# Altium PCB Main.PcbDoc
Units mil, origin at the board's own origin, x right, y up, seen from the top; angles counter-clockwise.
Board outline 791.74 x 1774.06 mil, 2 copper layers (Top Layer, Bottom Layer), stack 64.8 mil thick; 28 components, 18 nets, 121 pads, 67 vias.
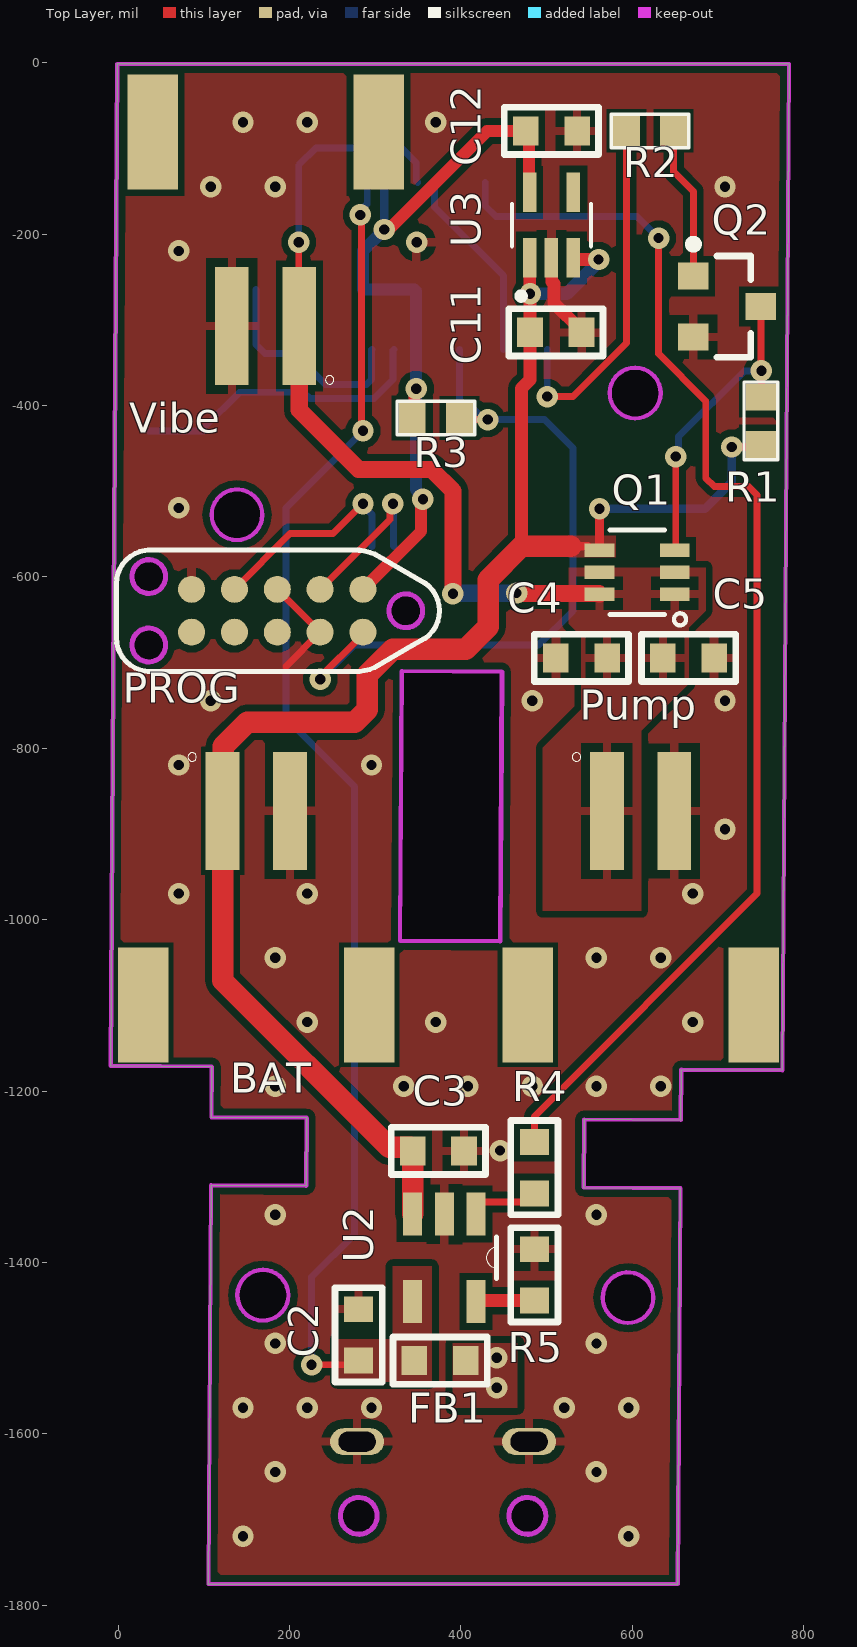
[diagram p0: Top Layer view]
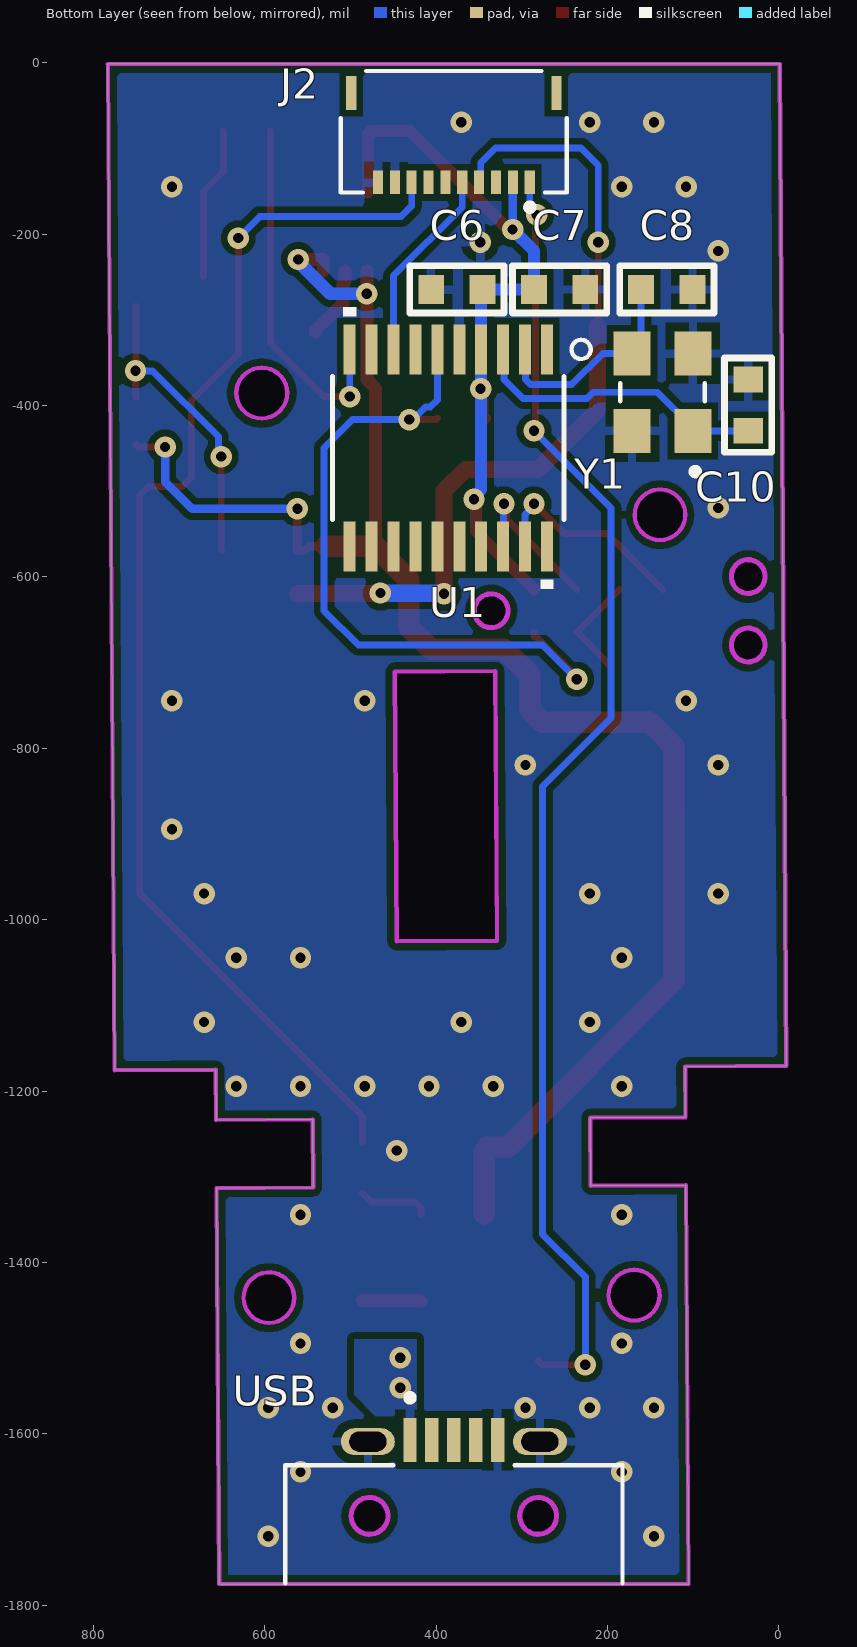
[diagram p1: Bottom Layer view, seen from below]
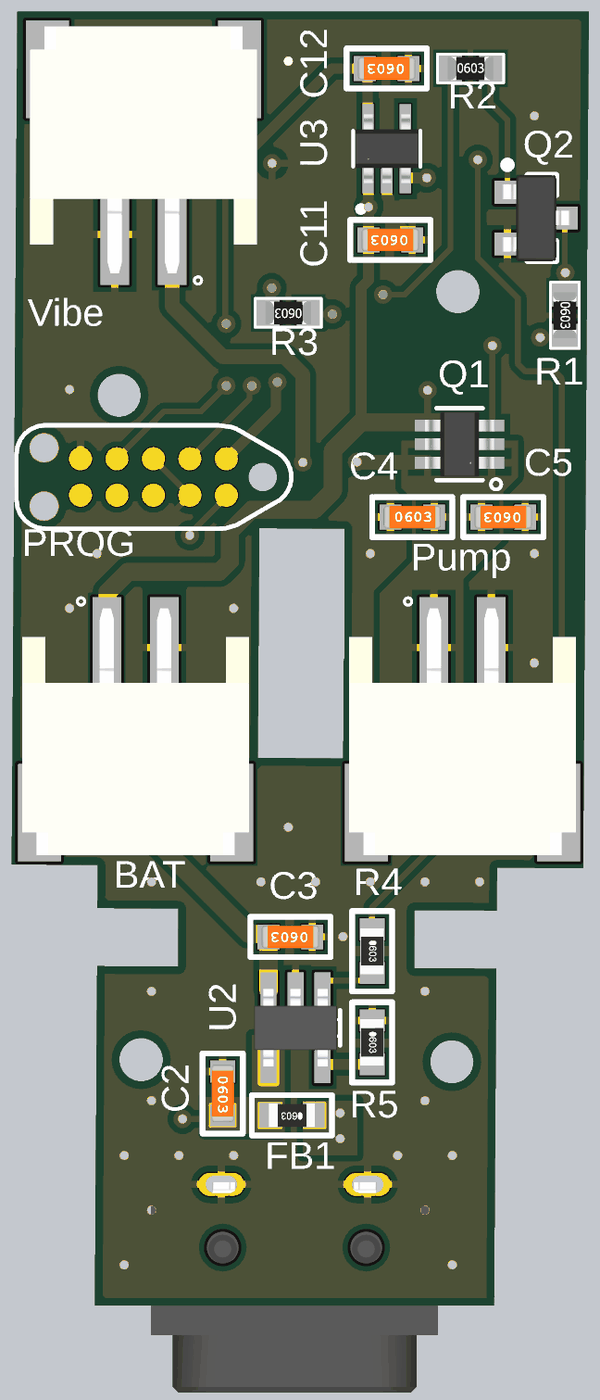
[diagram p2: 3D render of the assembled board from above, using the file's embedded part models]
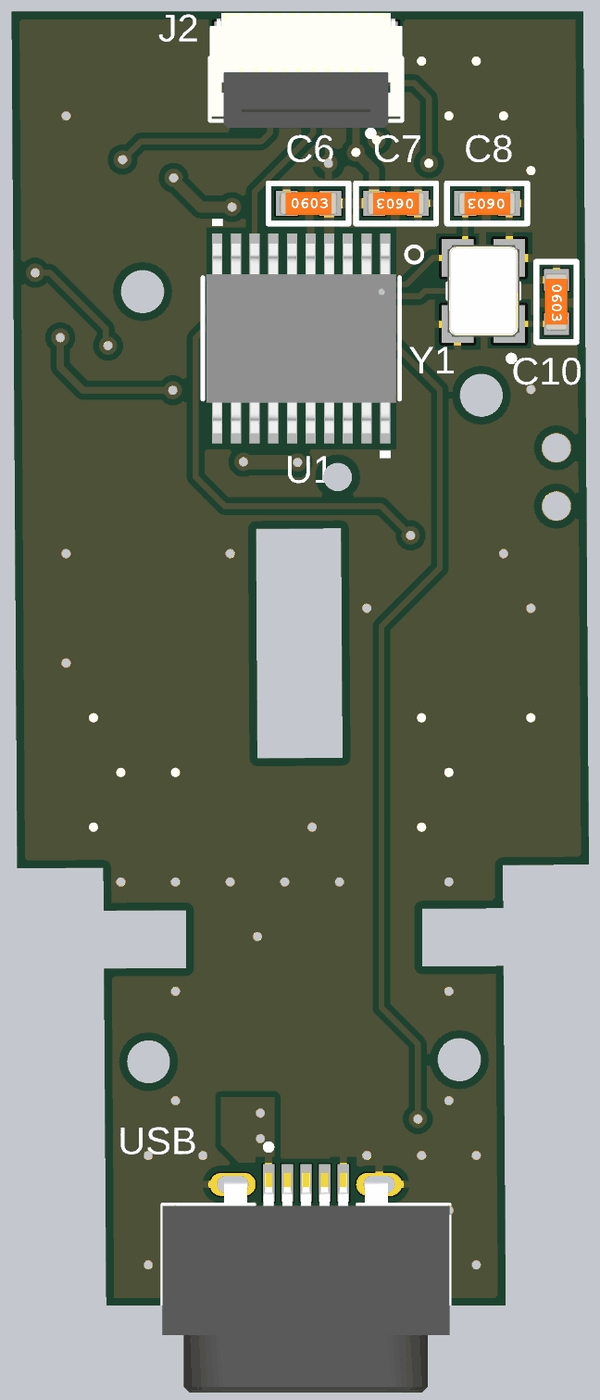
[diagram p3: 3D render of the assembled board from below, using the file's embedded part models]

## Layer stack, top to bottom
Top Solder: solder mask 0.4, Solder Resist, Dk 3.5
Top Layer: signal copper 1.4
Dielectric 1: dielectric 62, FR-4, Dk 4.8
Bottom Layer: signal copper 1.4
Bottom Solder: solder mask 0.4, Solder Resist, Dk 3.5

## Board outline
108.57,-1309.86 219.51,-1310.55 219.78,-1310.1 220.01,-1231.1 109.1,-1230.4 109.23,-1171.32 -8.61,-1170.54 -0.85,-1.26 783.13,-1.25 775.36,-1175.75 657.52,-1174.96 657.26,-1175.23 656.87,-1233.83 544.28,-1233.13 544.02,-1233.39 543.52,-1312.13 543.78,-1312.58 656.34,-1313.29 653.25,-1775.31 560.2,-1775.31 105.48,-1775.3
cut-out: 565.7,-1440.82 ccw(c595.24,-1441.02) 624.78,-1441.21 ccw(c595.24,-1441.02)
cut-out: 139.24,-1438.02 ccw(c169.04,-1437.97) 198.84,-1438.41 198.84,-1438.19 ccw(c169.04,-1438.37)
cut-out: 573.74,-385.16 ccw(c603.54,-385.12) 633.34,-385.55 633.34,-385.33 ccw(c603.53,-385.5)
cut-out: 109.3,-527.19 ccw(c138.82,-527.39) 168.35,-527.59 ccw(c138.82,-527.39)
cut-out: 329.36,-1024.46 445.91,-1025.23 446.18,-1024.97 448.26,-710.91 448.26,-710.93 446.18,-1024.78 448,-710.45 331.45,-709.68 331.18,-709.94 329.1,-1024 329.1,-1023.98

## Design rules (kind name [scope] priority, off if disabled: settings)
Clearance [All vs (InComponent('BAT') OR InComponent('Pump'))] p1: gap=6 ignorepadtopadclearanceinfootprint=TRUE except(1: Arc-SMDPad Track-SMDPad SMDPad-SMDPad)
Clearance Clearance_1 [All] p2: gap=8 ignorepadtopadclearanceinfootprint=TRUE except(0: Arc-Hole Track-Hole SMDPad-Hole THPad-Hole Via-Hole Fill-Hole Poly-Hole Region-Hole Text-Hole; 1: Arc-Text Track-Text SMDPad-Text THPad-Text Via-Text Fill-Text Poly-Text Region-Text Text-Text)
ComponentClearance [All] p1: gap=5 collisioncheckmode=3 verticalgap=5 showdistances=FALSE
MinimumSolderMaskSliver [All] p1: minsoldermaskwidth=5
PolygonConnect [All] p1: connectstyle=Relief reliefconductorwidth=10 reliefentries=4 polygonreliefangle="90 Angle" airgapwidth=10
RoutingVias [All] p1: holewidth=12 width=25 viastyle="Through Hole" minholewidth=12 minwidth=25 maxholewidth=28 maxwidth=50
SilkToSilkClearance [All] p1: silktosilkclearance=1
SilkToSolderMaskClearance [IsPad] p1: minsilkscreentomaskgap=0 clearancetoexposedcopper=TRUE
SolderMaskExpansion [All] p1: expansion=4 istentingtop=FALSE
SupplyNets "Schematic Supply Nets_5" [InNet('GND')] p1: voltage=0.000
SupplyNets "Schematic Supply Nets_4" [InNet('VCC')] p2: voltage=0.000
SupplyNets "Schematic Supply Nets_3" [InNet('VBUS')] p3: voltage=0.000
SupplyNets "Schematic Supply Nets_2" [InNet('VBAT')] p4: voltage=0.000
SupplyNets "Schematic Supply Nets_1" [InNet('Vmot')] p5: voltage=0.000
Width [All] p1: maxlimit=50 minlimit=8 preferedwidth=8 minimp=50.000000 maximp=50.000000 favimp=50.000000
26 further rules are at their usual default settings.

## Components (designator, comment, footprint, x,y, rotation, side; value= is the part's Value field where it differs from the comment)
BAT "S2B-PH-SM4-TB" JST_S2B-PH-SM4-TB 161.38,-873.06 r180 top
C2 "4.7 µF" CAP0603 280.87,-1484.44 r270 top
C3 "4.7 µF" CAP0603 373.81,-1269.87 r180 top
C4 "4.7 µF" CAP0603 540.87,-694.44 r0 top
C5 "4.7 µF" CAP0603 665.87,-694.44 r180 top
C6 "0.1 µF" CAP0603 375.87,-264.44 r180 bottom
C7 "4.7 µF" CAP0603 255.87,-264.44 r0 bottom
C8 "20pF" CAP0603 130.87,-264.44 r0 bottom
C10 "20pF" CAP0603 35.87,-399.44 r270 bottom
C11 "1 µF" CAP0603 510.87,-314.44 r180 top
C12 "1 µF" CAP0603 505.87,-79.44 r180 top
FB1 "220 Ohms" RES_0603 375.87,-1514.44 r180 top
J2 "5034801000" MOLEX_5034801000 379.37,-139.44 r0 bottom value=10
PROG "Programming Connector" TC2050 185.87,-639.44 r180 top value=TC2050-NL
Pump "S2B-PH-SM4-TB" JST_S2B-PH-SM4-TB 609.93,-873.06 r180 top
Q1 "MIC94052YC6-TR" SC70-6_MC_MCH 605.87,-594.44 r180 top value="MOSFET P-CH 6V 2A SC70-6"
Q2 "Transistor" SOT23 710.87,-284.44 r0 top value=MMBT2222LT1G
R1 "Resistor" "RES 0603" 750.24,-417.75 r270 top value=10K/1%
R2 "Resistor" "RES 0603" 620.87,-79.44 r0 top value=2.2K/1%
R3 "Resistor" "RES 0603" 370.87,-414.44 r180 top value=10K/1%
R4 "470 Ohms" RES_0603 485.87,-1289.44 r270 top
R5 "2K" RES_0603 485.87,-1414.44 r270 top
U1 "STM32G030F6P6" TSSOP20 385.87,-449.44 r270 bottom
U2 "MCP73831T-2ACI/OT" SOT95P280X145-5N 380.87,-1394.44 r270 top
U3 "MIC5365-3.3YC5-TR" SOT65P210X110-5N 505.87,-189.44 r90 top value="3V3 LDO"
USB "UJ2-MIBH-4-SMT-TR-67" CUI_UJ2-MIBH-4-SMT-TR-67 379.37,-1774.44 r90 bottom value="USB 2.0"
Vibe "S2B-PH-SM4-TB" JST_S2B-PH-SM4-TB 172.2,-306.98 r0 top
Y1 "ECS-80-12-33-JGN-TR" XTAL_ECS-240-8-33-AGN-TR 135.87,-384.44 r90 bottom value="8 MHz"

## Footprints (in the part's own frame and the unit in brackets; to place one, negate y for a bottom-side part, rotate by r counter-clockwise, add the part's x,y. Pads: shape width x height; smd on the part's side, far side on the other; paste and mask are expansions set on the pad)
CAP0603 [mil]
  rect 30x34 smd mask+2: 1(-30,0) 2(30,0)
  silkscreen extent -55,-28 55,28, body extent -39,-15 39,16, height 31
CUI_UJ2-MIBH-4-SMT-TR-67 [mm]
  rect 1.3x0.4 smd mask+0.051: 1(4.25,1.3) 2(4.25,0.65) 3(4.25,0) 4(4.25,-0.65) 5(4.25,-1.3)
  oval 0.8x1.6 hole 0.6 slot 1.1 at 90 deg mask+0.051: S1(4.2,2.55) S2(4.2,-2.55)
  round 1.1 hole 1.1 unplated: ""(2,-2.5) ""(2,2.5)
  silkscreen extent 0,-5 5.6,5, body extent -3.05,-5 4.6,5, height 4.41
JST_S2B-PH-SM4-TB [mm]
  rect 1x3.5 smd: 1(1,0) 2(-1,0)
  rect 1.5x3.4 smd: P1(3.35,5.75) P2(-3.35,5.75)
  silkscreen extent 1.77,-1.73 2.03,-1.47, body extent -3.95,-1.36 3.95,7.24, height 5.63
MOLEX_5034801000 [mm]
  rect 0.3x0.7 smd: 1(-2.25,0) 2(-1.75,0) 3(-1.25,0) 4(-0.75,0) 5(-0.25,0) 6(0.25,0) 7(0.75,0) 8(1.25,0) 9(1.75,0) 10(2.25,0)
  rect 0.3x1 smd: S1(-3.04,-2.65) S2(3.04,-2.65)
  silkscreen extent -3.35,-3.3 3.35,0.83, body extent -3.35,-3.45 3.35,0.55, height 1.02
"RES 0603" [mm]
  rect 0.8x0.9 smd: 1(-0.7,0) 2(0.7,0)
  silkscreen extent -1.15,-0.5 1.15,0.5, body extent -0.8,-0.4 0.8,0.4, height 0.43
RES_0603 [mil]
  rect 30x34 smd mask+2: 1(-30,0) 2(30,0)
  silkscreen extent -55,-28 55,28, body extent -31,-16 32,16, height 18
SC70-6_MC_MCH [mil]
  rect 34.67x16 smd paste+0 mask+0: 1(-43.91,25.59) 2(-43.91,0) 3(-43.91,-25.59) 4(43.91,-25.59) 5(43.91,0) 6(43.91,25.59)
  silkscreen extent -57,-49 32,62, body extent -47,-44 47,44, height 43
SOT23 [mm] "SOT23, 3-Leads, Body 2.90x2.35mm, Pitch 0.90mm, IPC Medium Density"
  rect 0.9x0.8 smd: 1(-1,0.9) 2(-1,-0.9) 3(1,0)
  silkscreen extent -1.12,-1.5 0.7,1.97, body extent -1.19,-1.5 1.19,1.5, height 1.1
SOT65P210X110-5N [mm]
  rect 1.17x0.4 smd mask+0.051: 1(-0.97,0.65) 2(-0.97,0) 3(-0.97,-0.65) 4(0.97,-0.65) 5(0.97,0.65)
  silkscreen extent -2.2,-1.17 0.63,1.17, body extent -1.19,-1.11 1.19,1.09, height 1.09
SOT95P280X145-5N [mil]
  rect 50x22 smd: 1(-51,37) 2(-51,0) 3(-51,-37) 4(51,-37) 5(51,37)
  silkscreen extent -24,49 24,61, body extent -53,-57 53,57, height 57
TC2050 [mm]
  round 0 hole 1: 0(3.81,1.015) S0(3.81,-1.015)
  round 0.8 smd paste-0.9 mask+0.04: 1(-2.54,-0.635) 2(-1.27,-0.635) 3(0,-0.635) 4(1.27,-0.635) 5(2.54,-0.635) 6(2.54,0.635) 7(1.27,0.635) 8(0,0.635) 9(-1.27,0.635) 10(-2.54,0.635)
  round 0.991 hole 0.991 unplated mask+0: ""(-3.81,0)
  silkscreen extent -4.81,-1.8 4.77,1.8
TSSOP20 [mil]
  rect 58x14 smd paste+0 mask+0: 1(-115,115.16) 2(-115,89.57) 3(-115,63.98) 4(-115,38.39) 5(-115,12.8) 6(-115,-12.8) 7(-115,-38.39) 8(-115,-63.98) 9(-115,-89.57) 10(-115,-115.16) 11(115,-115.16) 12(115,-89.57) 13(115,-63.98) 14(115,-38.39) 15(115,-12.8) 16(115,12.8) 17(115,38.39) 18(115,63.98) 19(115,89.57) 20(115,115.16)
  silkscreen extent -164,-135 164,166, body extent -130,-130 130,130, height 47
XTAL_ECS-240-8-33-AGN-TR [mm]
  rect 1.3x1.1 smd: 1(-1.15,-0.9) 2(1.15,-0.9) 3(1.15,0.9) 4(-1.15,0.9)
  silkscreen extent -2.45,-1.25 0.27,1.25, body extent -1.6,-1.25 1.6,1.25, height 0.8

## Part data
BAT Pump Vibe: "Connector Header Surface Mount, Right Angle 2 position 0.079 (2.00mm)", Part=S2B-PH-SM4-TB
C2 C3 C4 C5 C7: library part Capacitor, "CAP CER 4.7UF 10V X5R 0603", Part=CL10A475KP8NNNC
C6: library part Capacitor, "CAP CER 0.1UF 50V X7R 0603", Part=CL10B104KB8NNNC
C8 C10: library part Capacitor, "CAP CER 20PF 50V C0G/NPO 0603", Part=CC0603JRNPO9BN200
C11 C12: library part Capacitor, "CAP CER 1UF 16V X7R 0603", Part=C0603C105K4RAC7867
FB1: library part Res, "FERRITE BEAD 220 OHM 0603 1LN", Part=BLM18PG221SN1D
J2: "10 Position FFC, FPC Connector Contacts, Top and Bottom 0.020 _0.50mm_ Surface Mount, Right Angle", Part=5034801000
PROG: library part TC2050, "“No Legs” 10-pin Plug-of-Nails™ Cable fitted with a 10-pin 0.1″ pitch ribbon connector.", Assembly=DNP
Q1: "MOSFET P-CH 6V 2A SC70-6", Part=MIC94052YC6-TR
Q2: library part MMBT2222LT1G, "Small Signal Bipolar Transistor, 0.6A I(C), 30V V(BR)CEO, 1-Element, NPN, Silicon, TO-236", Collector-emitter Voltage-Max=30V, DC Current Gain-Min (hFE)=75, Frequency=250MHz, Manufacturer="ON Semiconductor", Max Collector Current=600mA, Max Operating Temperature=150°C, Package Body Material=Plastic, Package Shape=Rectangular, Package Style="SMALL OUTLINEMeter", Peak Reflow Temperature (Cel)=260°C, Power Dissipation-Max (Abs)=225mW, Time @ Peak Reflow Temperature-Max (s)=40s, Category=BJTs, ComponentLink1Description=https://datasheet.ciiva.com:443/pdfs/VipMasterIC/IC/ONSM/ONSM-S-A0002809824/ONSM-S-A0002809824-1.pdf?src-supplier=IHS+Markit, ComponentLink1URL=https://datasheet.ciiva.com:443/pdfs/VipMasterIC/IC/ONSM/ONSM-S-A0002809824/ONSM-S-A0002809824-1.pdf?src-supplier=IHS+Markit, ComponentLink2Description=https://datasheet.ciiva.com/976/mmbt2222lt1-d-976368.pdf?src-supplier=Digikey, ComponentLink2URL=https://datasheet.ciiva.com/976/mmbt2222lt1-d-976368.pdf?src-supplier=Digikey, ComponentLink3Description=https://datasheet.ciiva.com/976/mmbt2222lt1-d-976369.pdf?src-supplier=Digikey, ComponentLink3URL=https://datasheet.ciiva.com/976/mmbt2222lt1-d-976369.pdf?src-supplier=Digikey, ComponentLink4Description=https://datasheet.ciiva.com/976/mmbt2222lt1-d-976370.pdf?src-supplier=Digikey, ComponentLink4URL=https://datasheet.ciiva.com/976/mmbt2222lt1-d-976370.pdf?src-supplier=Digikey, ComponentLink5Description=https://datasheet.ciiva.com/4721/mmbt2222lt1-d-80103-4721468.pdf?src-supplier=Mouser, ComponentLink5URL=https://datasheet.ciiva.com/4721/mmbt2222lt1-d-80103-4721468.pdf?src-supplier=Mouser, ComponentLink6Description=https://datasheet.ciiva.com/11198/mmbt2222lt1-d-11198974.pdf?src-supplier=Avnet, ComponentLink6URL=https://datasheet.ciiva.com/11198/mmbt2222lt1-d-11198974.pdf?src-supplier=Avnet, ComponentLink7Description=https://datasheet.ciiva.com/11201/mmbt2222lt1-d-11201758.pdf?src-supplier=Avnet, ComponentLink7URL=https://datasheet.ciiva.com/11201/mmbt2222lt1-d-11201758.pdf?src-supplier=Avnet, ComponentLink8Description=https://datasheet.ciiva.com/15224/getdatasheetpartid-91924-15224358.pdf?src-supplier=Verical, ComponentLink8URL=https://datasheet.ciiva.com/15224/getdatasheetpartid-91924-15224358.pdf?src-supplier=Verical, DigiKey=MMBT2222LT1GOSCT-ND, JEDEC-95 Code=TO-236, JESD-30 Code=R-PDSO-G3, JESD-609 Code=e3, Moisture Sensitivity Level=1, Number of Elements=1, P/N=MMBT2222LT1G, Pins=3, Polarity/Channel Type=NPN, Pricing="1=0.14, 10=0.085, 100=0.0523, 500=0.03782, 1000=0.03311 (USD)", Qualification Status="Not Qualified", Reach SVHC Compliant=Yes, RoHS=Yes, RoHS Compliant=Yes, Stock=84926, Supplier=Digikey, Surface Mount=Yes, Terminal Finish=Tin, Terminal Form="Gull Wing", Terminal Position=DUAL, Transistor Application=SWITCHING, Transistor Element Material=SILICON, Turn-off Time-Max (toff)=285ns, Turn-on Time-Max (ton)=35ns
R1 R3: library part RC0603FR-0710KL, "RES SMD 10K OHM 1% 1/10W 0603", Case Code (Imperial)=0603, Case Code (Metric)=1608, Manufacturer=Yageo, Max Operating Temperature=155°C, Min Operating Temperature=-55°C, Power Rating=100mW, Resistance=10kR, Temperature Coefficient=100ppm/°C, Tolerance=1%, Voltage Rating=75V, Voltage Rating (DC)=50V, Case/Package=0603, ComponentLink1Description=https://datasheet.ciiva.com/7660/38590-7660789.pdf?src-supplier=Element14, ComponentLink1URL=https://datasheet.ciiva.com/7660/38590-7660789.pdf?src-supplier=Element14, ComponentLink2Description=https://datasheet.ciiva.com/15189/getdatasheetpartid-409289-15189591.pdf?src-supplier=Verical, ComponentLink2URL=https://datasheet.ciiva.com/15189/getdatasheetpartid-409289-15189591.pdf?src-supplier=Verical, ComponentLink3Description=https://datasheet.ciiva.com/46440/1868787-46440891.pdf?src-supplier=Element14, ComponentLink3URL=https://datasheet.ciiva.com/46440/1868787-46440891.pdf?src-supplier=Element14, ComponentLink4Description=https://datasheet.ciiva.com/7983/443971-7983596.pdf?src-supplier=Element14, ComponentLink4URL=https://datasheet.ciiva.com/7983/443971-7983596.pdf?src-supplier=Element14, ComponentLink5Description=https://datasheet.ciiva.com/7746/1738695-7746239.pdf?src-supplier=Element14, ComponentLink5URL=https://datasheet.ciiva.com/7746/1738695-7746239.pdf?src-supplier=Element14, ComponentLink6Description=https://datasheet.ciiva.com/22747/443971-22747519.pdf?src-supplier=Element14, ComponentLink6URL=https://datasheet.ciiva.com/22747/443971-22747519.pdf?src-supplier=Element14, Composition="Thick Film", Depth=0.8mm, DigiKey=311-10.0KHRDKR-ND, Height=0.45mm, Lead Free="Lead Free", Lead Pitch=0.3mm, Length=1.6mm, Military Standard=Not, Number of Pins=2, P/N=RC0603FR-0710KL, Packaging="Tape and Reel", Pricing 1="1=0.10000, 10=0.02300, 100=0.00940, 1000=0.00421, 2500=0.00366 (USD)", REACH SVHC="No SVHC", RoHS=Yes, Stock 1=55833360, Supplier 1=Digi-Key, Termination=SMD/SMT, Weight=7.1E-05oz, Width=0.8mm
R2: library part CRCW06032K20FKEA, "RES SMD 2.2K OHM 1% 1/10W 0603", Case Code (Imperial)=0603, Case Code (Metric)=1608, Manufacturer=Vishay, Max Operating Temperature=155°C, Max Power Dissipation=100mW, Min Operating Temperature=-55°C, Package Quantity=10, Resistance=2.2kR, Temperature Coefficient=100ppm/°C, Tolerance=1%, Voltage Rating=75V, Case/Package=0603, ComponentLink1Description=https://datasheet.ciiva.com/11809/0900766b80d98afc-11809110.pdf?src-supplier=RSComponents, ComponentLink1URL=https://datasheet.ciiva.com/11809/0900766b80d98afc-11809110.pdf?src-supplier=RSComponents, ComponentLink2Description=https://datasheet.ciiva.com/26314/fld-crcw-e3-data-en-26314687.pdf?src-supplier=Distrelec, ComponentLink2URL=https://datasheet.ciiva.com/26314/fld-crcw-e3-data-en-26314687.pdf?src-supplier=Distrelec, ComponentLink3Description=https://datasheet.ciiva.com/2465/dcrcwe3-2465603.pdf?src-supplier=Digi-Key, ComponentLink3URL=https://datasheet.ciiva.com/2465/dcrcwe3-2465603.pdf?src-supplier=Digi-Key, ComponentLink4Description=https://datasheet.ciiva.com/2465/dcrcwe3-2465604.pdf?src-supplier=Digi-Key, ComponentLink4URL=https://datasheet.ciiva.com/2465/dcrcwe3-2465604.pdf?src-supplier=Digi-Key, ComponentLink5Description=https://datasheet.ciiva.com/2465/dcrcwe3-2465605.pdf?src-supplier=Digi-Key, ComponentLink5URL=https://datasheet.ciiva.com/2465/dcrcwe3-2465605.pdf?src-supplier=Digi-Key, ComponentLink6Description=https://datasheet.ciiva.com/7777/1697337-7777306.pdf?src-supplier=Element14, ComponentLink6URL=https://datasheet.ciiva.com/7777/1697337-7777306.pdf?src-supplier=Element14, ComponentLink7Description=https://datasheet.ciiva.com/3257/dcrcwe3-3257374.pdf?src-supplier=Avnet, ComponentLink7URL=https://datasheet.ciiva.com/3257/dcrcwe3-3257374.pdf?src-supplier=Avnet, ComponentLink8Description=https://datasheet.ciiva.com/5543/dcrcwe3-109170-5543147.pdf?src-supplier=Mouser, ComponentLink8URL=https://datasheet.ciiva.com/5543/dcrcwe3-109170-5543147.pdf?src-supplier=Mouser, ComponentLink9Description=https://datasheet.ciiva.com/3257/dcrcwe3-3257375.pdf?src-supplier=Avnet, ComponentLink9URL=https://datasheet.ciiva.com/3257/dcrcwe3-3257375.pdf?src-supplier=Avnet, ComponentLink10Description=https://datasheet.ciiva.com/16218/dcrcwe3-16218063.pdf?src-supplier=Future+Electronics, ComponentLink10URL=https://datasheet.ciiva.com/16218/dcrcwe3-16218063.pdf?src-supplier=Future+Electronics, Composition="Thick Film", Contact Plating=Tin, Depth=0.85mm, DigiKey=541-2.20KHCT-ND, Features="Automotive AEC-Q200", Height=0.45mm, Lead Free="Lead Free", Length=1.55mm, Military Standard=Not, Mount="Surface Mount", Number of Terminations=2, P/N=CRCW06032K20FKEA, Packaging="Tape and Reel", Power Rating=100mW, Pricing 1="1=0.10000, 10=0.03400, 100=0.01390, 1000=0.00623, 2500=0.00540 (USD)", Radiation Hardening=No, REACH SVHC=Unknown, RoHS=Yes, Stock 1=98601, Supplier 1=Digi-Key, Termination=SMD/SMT, Voltage Rating (DC)=75V, Weight=7.1E-05oz, Width=0.033inch
R4: library part Res, "RES SMD 470 OHM 1% 1/10W 0603", Part=CR0603-FX-4700ELF
R5: library part Res, "RES SMD 2K OHM 1% 1/10W 0603", Part=CR0603-FX-2001ELF
U1: "No Description Available", Part=STM32G030F6P6
U2: "Charger IC Lithium Ion/Polymer SOT-23-5", Part=MCP73831T-2ACI/OT
U3: "Linear Voltage Regulator IC 1 Output 150mA SC-70-5", MP=MIC5365-3.3YC5-TR
USB: "Micro B, USB 2.0, 1.8 A, Right Angle, Surface Mount (SMT), Waterproof, USB Receptacle", Part=UJ2-MIBH-4-SMT-TR-67
Y1: "8MHz Â±20ppm Crystal 12pF 400 Ohms 4-SMD, No Lead", MF=ECS-80-12-33-JGN-TR

## Via types
v1: diameter 25, hole 12, Top Layer to Bottom Layer, tented both sides, 67 vias

## Nets (pads, with @x,y where several pads share a name; then routed paths per layer and width w, separated by ;. In a path a pad name is that pad's centre, name@x,y a point inside that pad or via, vN(x,y) a via of type N, cw(c..) or ccw(c..) an arc to the next point about the centre after c; other vN are vias at no path point)
Charging_LED: J2.8 R4.1 | length 1479.2
  Top Layer w8: R4.1 485.87,-1229.44 745.87,-969.44 745.87,-504.44 735.87,-494.44 695.87,-494.44 685.87,-484.44 685.87,-394.44 630.87,-339.44 v1(630.87,-204.44)
  Bottom Layer w8: J2.8 428.58,-167.16 440.87,-179.44 605.87,-179.44 v1(630.87,-204.44)
GND: BAT.2 C2.1 C3.1 C4.1 C5.1 C6.1 C7.1 C8.1 C10.1 C11.1 C12.1 J2.9 J2.10 PROG.3 PROG.5 PROG.9 Pump.2 Q2.2 R5.1 U1.5 U2.2 U3.2 USB.5 USB.S1 USB.S2 Vibe.2 Y1.2 Y1.4 | length 213.6
  Top Layer w8: PROG.3 PROG.9 195.87,-704.44
  Top Layer w15: U3.2@505.87,-242.63 506.24,-243 506.24,-255.22 508.87,-257.84 508.87,-280.44 540.87,-312.44 C11.1
  other v1: 145.87,-1719.44 595.87,-1719.44 183.37,-1644.44 558.37,-1644.44 145.87,-1569.44 220.87,-1569.44 295.87,-1569.44 520.87,-1569.44 595.87,-1569.44 183.37,-1494.44 558.37,-1494.44 183.37,-1344.44 558.37,-1344.44 445.87,-1269.44 183.37,-1194.44 333.37,-1194.44 408.37,-1194.44 483.37,-1194.44 558.37,-1194.44 633.37,-1194.44 220.87,-1119.44 370.87,-1119.44 670.87,-1119.44 183.37,-1044.44 558.37,-1044.44 633.37,-1044.44 70.87,-969.44 220.87,-969.44 670.87,-969.44 708.37,-894.44 70.87,-819.44 295.87,-819.44 108.37,-744.44 483.37,-744.44 708.37,-744.44 70.87,-519.44 70.87,-219.44 348.58,-209.44 108.37,-144.44 183.37,-144.44 708.37,-144.44 145.87,-69.44 220.87,-69.44 370.87,-69.44
Motor_CON: R2.1 U1.10 | length 420.9
  Top Layer w8: v1(500.87,-389.44) 530.87,-389.44 593.31,-327 R2.1
  Bottom Layer w8: v1(500.87,-389.44) 500.94,-389.36 500.94,-334.52 U1.10
NetC8_2: C8.2 U1.2 Y1.3 | length 256.3
  Bottom Layer w8: C8.2 160.87,-328.73 Y1.3 205.59,-339.16 241.87,-375.44 289.87,-375.44 295.87,-369.44 295.87,-334.87 U1.2
NetC10_2: C10.2 U1.3 Y1.1 | length 353.9
  Bottom Layer w8: C10.2 100.16,-429.44 Y1.1 100.43,-425.78 141.77,-384.44 216.71,-384.44 224.01,-391.75 298.56,-391.75 320.87,-369.44 320.87,-335.46 U1.3
NetFB1_1: FB1.1 USB.1
  other v1: 441.92,-1546.34 441.92,-1511.34
NetJ2_5: J2.5 U1.8 | length 228.3
  Bottom Layer w8: J2.5 369.53,-168.1 449.84,-248.42 U1.8
NetPROG_2: PROG.2 U1.18 | length 185.6
  Top Layer w8: PROG.2 317.61,-532.69 317.61,-517.69 v1(320.87,-514.44)
  Bottom Layer w8: v1(320.87,-514.44) 321.38,-514.95 321.38,-563.93 U1.18
NetPROG_4: PROG.4 U1.19 | length 245.7
  Top Layer w8: PROG.4 200.87,-549.44 250.87,-549.44 v1(285.87,-514.44)
  Bottom Layer w8: v1(285.87,-514.44) 285.87,-516.55 296.3,-526.98 U1.19
NetQ1_3: Q1.3 Q2.3 R1.1 | length 369
  Top Layer w8: Q1.3 650.87,-567.76 v1(650.87,-459.44) ; R1.1 750.24,-390.07 750.87,-389.44 v1(750.87,-359.44) ; v1@750.24,-359.44 Q2.3
  Bottom Layer w8: v1(650.87,-459.44) 654.12,-456.19 654.12,-436.19 730.87,-359.44 v1(750.87,-359.44)
NetQ2_1: Q2.1 R2.2 | length 179.1
  Top Layer w8: R2.2 648.42,-127 671.49,-150.07 Q2.1
NetR4_2: R4.2 U2.1 | length 82
  Top Layer w8: U2.1 417.87,-1336.44 424.87,-1329.44 475.87,-1329.44 R4.2
NetR5_2: R5.2 U2.5 | length 68.4
  Top Layer w15: U2.5 418.87,-1444.44 R5.2
NRST: PROG.10 R3.1 U1.6 | length 841.1
  Top Layer w8: v1@235.87,-716.94 283.37,-669.44 285.87,-669.44 PROG.10 ; R3.1 400.32,-416.33 v1(431.48,-416.33)
  Bottom Layer w8: v1(235.87,-719.44) 275.87,-679.44 490.87,-679.44 530.87,-639.44 530.87,-449.44 497.76,-416.33 v1(431.48,-416.33) 426.88,-416.33 412.32,-401.77 406.96,-401.77 398.66,-393.47 U1.6
VBAT: BAT.1 C3.2 C11.2 Q1.4 R1.2 U2.3 U3.1 U3.3 | length 2004.3
  Top Layer w8: v1(716.41,-448.26) 747.28,-448.26 R1.2
  Top Layer w10: 528.43,-564.3 548.07,-564.3 552.62,-568.85 Q1.4 v1(561.96,-520.53)
  Top Layer w15: 471,-564.3 470.87,-564.16 470.87,-379.84 480.87,-369.84 C11.2 ; U3.1@480.27,-242.63 480.57,-242.92 480.57,-269.14 v1(480.87,-269.44) C11.2@480.87,-314.14 ; U3.3@531.46,-242.63 531.46,-229.81 531.83,-229.44 v1(560.87,-229.44)
  Top Layer w25: U2.3 343.84,-1269.9 341.31,-1267.37 341.31,-1265.37 316.44,-1265.37 122.01,-1070.94 BAT.1 122.94,-872.13 122.94,-797.37 150.87,-769.44 276.22,-769.44 290.87,-754.8 290.87,-714.08 320.51,-684.44 405.87,-684.44 432.11,-658.2 432.11,-603.2 471,-564.3 528.43,-564.3
  Bottom Layer w10: v1(561.96,-520.53) 684.77,-520.53 716.41,-488.9 v1(716.41,-448.26)
  Bottom Layer w15: v1(480.87,-269.44) 523.57,-269.44 560.87,-232.15 v1(560.87,-229.44)
VBUS: C2.2 FB1.2 J2.1 U2.4 | length 1533
  Top Layer w8: v1(225.87,-1519.44) 275.87,-1519.44 C2.2 ; v1(282.57,-177.46) 284.22,-179.11 284.22,-427.79 v1(285.87,-429.44)
  Bottom Layer w8: v1(225.87,-1519.44) 225.87,-1417.14 275.87,-1367.14 275.87,-844.44 195.87,-764.44 195.87,-519.44 v1(285.87,-429.44) ; v1(282.57,-177.46) 282.57,-173.14 290.79,-164.92 J2.1
VCC: C6.2 C7.2 C12.2 J2.2 PROG.1 R3.2 U1.4 U3.5 | length 901
  Top Layer w14: PROG.1 353.76,-546.54 353.76,-511.54 v1(355.87,-509.44) ; v1(310.87,-194.44) 315.87,-194.44 430.87,-79.44 C12.2 479.4,-82.98 479.4,-150.38 U3.5 ; R3.2 346.11,-411.63 346.11,-382.52 v1(348.22,-380.41)
  Bottom Layer w10: J2.2 310.67,-139.64 310.67,-194.24 v1(310.87,-194.44)
  Bottom Layer w14: v1(310.87,-194.44) 285.87,-219.44 C7.2 C6.2 347.48,-266.05 U1.4 347.48,-498.08 355.87,-506.46 v1(355.87,-509.44)
Vmot: C4.2 C5.2 J2.4 Pump.1 Q1.1 Q1.2 Q1.5 Q1.6 Vibe.1 | length 972.5
  Top Layer w8: v1(210.87,-209.44) 210.87,-306.27 Vibe.1
  Top Layer w20: Vibe.1 211.57,-405.14 280.87,-474.44 365.87,-474.44 390.87,-499.44 v1(390.87,-619.44) ; v1(465.11,-618.68) 465.78,-619.36 561.28,-619.36 Q1.6
  Bottom Layer w8: v1(210.87,-209.44) 210.87,-119.44 230.87,-99.44 330.87,-99.44 348.06,-116.64 348.06,-137.66 J2.4
  Bottom Layer w20: v1(390.87,-619.44) 391.25,-619.06 464.72,-619.06 v1(465.11,-618.68)
pads on no net: BAT.P1 BAT.P2 J2.3 J2.6 J2.7 J2.S1 J2.S2 PROG. PROG.0 PROG.6 PROG.7 PROG.8 PROG.S0 Pump.P1 Pump.P2 U1.1 U1.7 U1.9 U1.11 U1.12 U1.13 U1.14 U1.15 U1.16 U1.17 U1.20 U3.4 USB. USB.2 USB.3 USB.4 Vibe.P1 Vibe.P2

## Polygon pours and split planes (outlines as drawn)
GND on Bottom Layer "GND_L02_P008" (solid, remove dead copper, pour order 8): 108.57,-1309.86 219.51,-1310.55 219.78,-1310.1 220.01,-1231.1 109.1,-1230.4 109.23,-1171.32 -8.61,-1170.54 -0.85,-1.26 783.13,-1.25 775.36,-1175.75 657.52,-1174.96 657.26,-1175.23 656.87,-1233.83 544.28,-1233.13 544.02,-1233.39 543.52,-1312.13 543.78,-1312.58 656.34,-1313.29 653.25,-1775.31 560.2,-1775.31 105.48,-1775.3
NetFB1_1 on Bottom Layer "NETFB1_1_L02_P000" (solid, remove dead copper, pour order 0): 422.64,-1591.21 422.64,-1489.44 495.87,-1489.44 495.87,-1554.44 470.87,-1579.44 450.87,-1579.44 440.87,-1589.44 440.87,-1639.44 422.64,-1639.44
GND on Top Layer "GND_L01_P007" (solid, remove dead copper, pour order 7): 109.42,-1308.6 220.36,-1309.29 220.63,-1308.84 220.86,-1229.84 109.95,-1229.14 110.08,-1170.06 -7.76,-1169.28 0,0 783.98,0.01 776.22,-1174.49 658.37,-1173.7 658.11,-1173.97 657.72,-1232.57 545.13,-1231.87 544.87,-1232.13 544.37,-1310.87 544.64,-1311.32 657.19,-1312.03 654.1,-1774.05 561.06,-1774.05 106.33,-1774.04
VBAT on Top Layer "VBAT_L01_P004" (solid, remove dead copper, pour order 4): 525.87,-576.88 580.86,-576.88 580.86,-552.01 525.87,-552.01
Vmot on Top Layer "VMOT_L01_P003" (solid, pour order 3): 525.87,-589.44 685.87,-589.44 685.87,-639.44 665.87,-659.44 665.87,-724.44 610.87,-779.44 610.87,-989.44 495.87,-989.44 495.87,-799.44 540.86,-754.44 540.87,-669.44 525.87,-654.44
VBUS on Top Layer "VBUS_L01_P002" (solid, remove dead copper, pour order 2): 255.87,-1489.44 320.87,-1489.44 320.87,-1404.44 365.87,-1404.44 365.87,-1544.44 360.87,-1539.44 255.87,-1539.44
NetFB1_1 on Top Layer "NETFB1_1_L01_P001" (solid, pour order 1): 390.87,-1494.44 465.87,-1494.44 465.87,-1569.44 390.87,-1569.44

## Keep-outs
Keep-Out Layer:
  circle w6: c335.87,-639.44 r19.68
  circle w6: c35.87,-679.4 r19.68
  circle w6: c35.87,-599.48 r19.68
  circle w6: c477.79,-1695.7 r21.5
  circle w6: c280.94,-1695.7 r21.5
  lines w5: 139.24,-1438.02 ccw(c169.04,-1437.97) 198.84,-1438.41 198.84,-1438.19 ccw(c169.04,-1438.37) 139.24,-1437.81 ; 560.2,-1775.31 105.48,-1775.3 108.57,-1309.86 219.51,-1310.55 219.78,-1310.29 220.27,-1231.55 220.27,-1231.57 219.78,-1310.1 220.01,-1231.1 109.1,-1230.4 ; 560.47,-1775.31 653.25,-1775.31 656.34,-1313.29 543.78,-1312.58 544.01,-1233.58 543.52,-1312.11 ; 573.74,-385.16 ccw(c603.54,-385.12) 633.34,-385.55 633.34,-385.33 ccw(c603.53,-385.5) 573.74,-384.96 ; 109.1,-1230.4 109.23,-1171.32 -8.61,-1170.54 -0.85,-1.26 783.13,-1.25 775.36,-1175.75 657.52,-1174.96 657.26,-1175.23 656.87,-1233.83 544.28,-1233.13 544.02,-1233.39 543.52,-1312.13 ; 109.1,-1230.4 109.49,-1171.8 ; 109.1,-1230.4 109.49,-1171.78 ; 109.49,-1171.8 109.49,-1171.78 ; 329.1,-1023.98 329.36,-1024.46 445.91,-1025.23 446.18,-1024.97 448.26,-710.91 448.26,-710.93 446.18,-1024.78 448,-710.45 331.45,-709.68 331.18,-709.94 329.1,-1024 ; 329.1,-1024 329.1,-1023.98 ; 543.52,-1312.13 543.52,-1312.11 ; 109.3,-527.19 cw(c138.82,-527.39) 168.35,-527.59 cw(c138.82,-527.39) 109.3,-527.19 ; 565.7,-1440.82 cw(c595.24,-1441.02) 624.78,-1441.21 cw(c595.24,-1441.02) 565.7,-1440.82

## Silkscreen, mask and mechanical layers (free items; w line width, h text height)
Mechanical 3:
  drawing of 180 lines, arcs and shapes, not listed

## Dimensions
-0.85,-1.26 to 105.48,-1775.3 on Mechanical 3
-1.11,-0.8 to 783.13,-1.25 on Mechanical 3

## Text inside footprints (layer, text, board x,y; h text height)
Q1: Mechanical 13 "*" at 634.94,-593.03 h60 r180
U1: Mechanical 13 "*" at 308.87,-363.94 h50 r90
USB: Mechanical 13 "PCB EDGE" at 595.91,-1778.38 h10 r270